# EAGLE board Report4 (EAGLE 9.7.0)

Size 67.1 x 273.61 mm. Coordinates in mm from the lower left corner, seen from the top.
Outline: 0,0 67.1,0 67.1,273.61 0,273.61 0,0
Copper layers (1*16): Top 0.035mm / dielectric 1.5mm / Bottom 0.035mm
Design rules "default": minimum track width 6mil, minimum drill 0.35mm, track to track 6mil, track to pad 6mil, pad to pad 6mil, via to via 6mil, smd to smd 6mil, copper to edge 40mil, drill to drill 6mil, minimum pad ring 10mil, minimum via ring 8mil, stop-mask expansion 4mil, vias tented up to drill 0mil, thermal gap 10mil

## Footprints (pad centres in the part's own frame; a part is rotated, then mirrored left to right if it is on the bottom)
RESAD1016W63L850D250B = drill 0.83 pad 1.43: 1 -5.08,0; 2 5.08,0

## Placement (x,y rotation side)
R1  1k  [RESAD1016W63L850D250B]  8.97,267.28 0 top
R2  1k  [RESAD1016W63L850D250B]  19.13,264.74 0 top
R3  1k  [RESAD1016W63L850D250B]  29.29,267.28 0 top
R4  1k  [RESAD1016W63L850D250B]  23.1,183.58 0 top
R5  1k  [RESAD1016W63L850D250B]  23.1,181.04 0 top
R6  1k  [RESAD1016W63L850D250B]  23.1,186.12 0 top
R7  1k  [RESAD1016W63L850D250B]  35.57,100.27 0 top
R8  1k  [RESAD1016W63L850D250B]  35.57,77.41 0 top
R9  1k  [RESAD1016W63L850D250B]  15.25,100.27 0 top
R10  1k  [RESAD1016W63L850D250B]  15.25,77.41 0 top
R11  1k  [RESAD1016W63L850D250B]  40.65,87.57 90 top
R12  1k  [RESAD1016W63L850D250B]  30.49,87.57 90 top
R13  1k  [RESAD1016W63L850D250B]  22.87,88.25 120 top
R14  1k  [RESAD1016W63L850D250B]  32.83,6.33 180 top
R15  1k  [RESAD1016W63L850D250B]  32.83,24.11 180 top
R16  1k  [RESAD1016W63L850D250B]  55.69,6.33 180 top
R17  1k  [RESAD1016W63L850D250B]  55.69,24.11 180 top
R18  1k  [RESAD1016W63L850D250B]  50.61,16.49 90 top
R19  1k  [RESAD1016W63L850D250B]  60.77,13.95 90 top
R20  1k  [RESAD1016W63L850D250B]  40.45,14.63 300 top

## Library data of the parts
R1-R20 = Tinkercad

## Nets
R2_1: R1.2 R2.1
R2_2: R2.2 R3.1
R5_1: R4.1 R5.1 R6.1
R5_2: R4.2 R5.2 R6.2
R7_2: R7.2 R11.2
R8_2: R8.2 R11.1
R9_2: R7.1 R9.2 R12.2 R13.2
R10_2: R8.1 R10.2 R12.1
R14_1: R14.1 R16.2 R18.1 R20.2
R16_1: R16.1 R19.1
R17_1: R17.1 R19.2
R20_1: R14.2 R15.1 R15.2 R17.2 R18.2 R20.1

## Tracks (layer width: path | path; a pad name or v marks a point on that pad's centre or on a via)
R2_1  (1 unrouted)
R2_2  (1 unrouted)
R5_1  (2 unrouted)
R5_2  (2 unrouted)
R7_2  (1 unrouted)
R8_2  (1 unrouted)
R9_2  (3 unrouted)
R10_2  (2 unrouted)
R14_1  (3 unrouted)
R16_1  (1 unrouted)
R17_1  (1 unrouted)
R20_1  (5 unrouted)